# Altium PCB PCB_STM32-v1.1.PcbDoc (part 3 of 3)
Units mil, origin at the board's own origin, x right, y up, seen from the top; angles counter-clockwise.
Board outline 4000 x 2000 mil, 2 copper layers (Top Layer, Bottom Layer), stack 61.811 mil thick; 77 components, 88 nets, 371 pads, 188 vias.
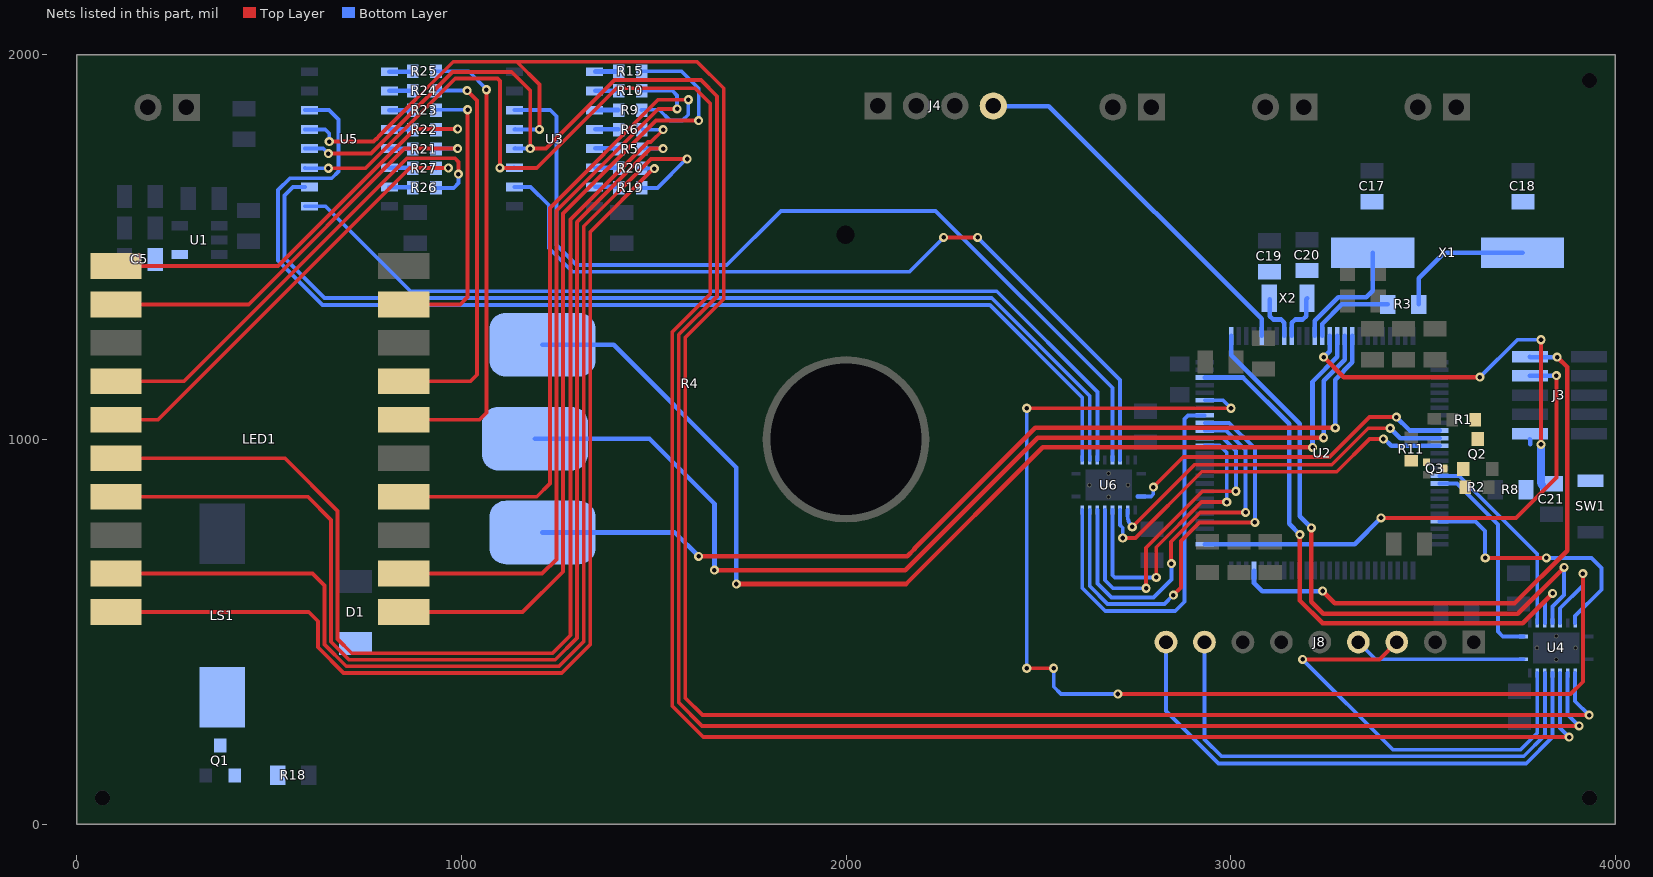
[diagram p2: the nets of this part, all layers, seen from the top]

## Via types
v1: diameter 23.62, hole 11.81, Top Layer to Bottom Layer, 188 vias

## Nets (pads, with @x,y where several pads share a name; then routed paths per layer and width w, separated by ;. In a path a pad name is that pad's centre, name@x,y a point inside that pad or via, vN(x,y) a via of type N, cw(c..) or ccw(c..) an arc to the next point about the centre after c; other vN are vias at no path point) (continued)
HS_B2: U5.1 U6.14 | length 2437.5
  Bottom Layer w10: U5.1@593.35,1606 647,1606 868,1385 2392,1385 2653.47,1123.53 U6.14@2653.47,945.96
HS_BI: U3.4 U4.14 U5.4 | length 5610.3
  Top Layer w10: v1(654,1743) 765.01,1743 977.01,1955 1131,1955 1179,1907 v1(1179,1756) ; v1@1179,1749.14 v1(1179,1756) ; v1(3906,255) 1626,255 1565.19,315.81 1565.19,1272.23 1664.86,1371.9 1664.86,1892.14 1623,1934 1398,1934 1220,1756 v1(1179,1756)
  Bottom Layer w10: U5.4@593.35,1756 641,1756 v1(654,1743) ; U3.4@1139.85,1757.5 U3.4@1138.35,1756 v1(1179,1756) ; U4.14@3876.15,393.01 3876.15,284.85 v1(3906,255)
HS_C1: U3.2 U6.17 | length 2129.2
  Top Layer w10: v1(2254,1525) v1(2342,1525)
  Bottom Layer w10: U3.2@1138.35,1656 1180,1656 1227,1609 1227,1498 1289,1436 2165,1436 v1(2254,1525) ; v1(2342,1525) 2712.53,1154.47 U6.17@2712.53,945.96
HS_C3: U5.2 U6.13 | length 2634.1
  Bottom Layer w10: U5.2@593.35,1656 562,1656 540,1634 540,1472 644,1368 2378.98,1368 2633.79,1113.19 U6.13@2633.79,945.96
HS_D1: U3.6 U6.16 | length 2354.7
  Bottom Layer w10: U3.6@1138.35,1856 1231,1856 1247,1840 1247,1505 1299,1453 1690,1453 1831,1594 2233,1594 2692.84,1134.16 U6.16@2692.84,945.96
HS_D4: U5.6 U6.12 | length 2994.1
  Bottom Layer w10: U5.6@593.35,1856 656,1856 680.18,1831.82 680.18,1696.18 663,1679 554,1679 523,1648 523,1464.96 638.96,1349 2373.93,1349 2614.1,1108.83 U6.12@2614.1,945.96
HS_LE: U3.5 U4.13 U5.5 | length 5615.7
  Top Layer w10: v1(656.37,1774.19) 771.19,1774.19 778,1781 778.97,1781 786,1788.03 786,1789 979,1982 1144,1982 1203,1923 v1(1203,1806) ; 1145,1982 1613,1982 1682,1913 1682,1365 1582.19,1265.19 1582.19,327.91 1627.1,283 v1(3932,283)
  Bottom Layer w10: U5.5@593.35,1806 646,1806 656.37,1795.63 v1(656.37,1774.19) ; U3.5@1139.85,1807.5 U3.5@1138.35,1806 v1(1203,1806) ; U4.13@3895.83,393.01 3895.83,319.17 v1(3932,283)
HS_LT: U3.3 U4.15 U5.3 | length 5671.1
  Top Layer w10: v1(654,1705) 751.05,1705 984.05,1938 1094.14,1938 1100,1932.14 v1(1100,1706) 1196,1706 1403,1913 1607.04,1913 1647,1873.04 1647,1378.08 1548.19,1279.27 1548.19,306.81 1629,226 v1(3880,226)
  Bottom Layer w10: U5.3@593.35,1706 594.35,1705 v1(654,1705) ; v1(1100,1706) U3.3@1138.35,1706 U3.3@1136.85,1707.5 ; U4.15@3856.46,393.01 3856.46,249.54 v1(3880,226)
HS_RESET: J8.9 U4.16 | length 1435.7
  Bottom Layer w10: J8.9@2832,473 2832,294 2968.38,157.62 3768.53,157.62 3836.78,225.86 U4.16@3836.78,393.01
HS_SLEEP: J8.8 U4.17 | length 1341.1
  Bottom Layer w10: J8.8@2932,473 2932,220 2976,176 3762,176 3817.09,231.09 U4.17@3817.09,393.01
LE: U2.47 U4.8 | length 683.1
  Top Layer w10: v1(3662,692.04) v1(3820.96,692.04)
  Bottom Layer w10: U2.47@3543.12,786.83 3637.17,786.83 3661.81,762.19 v1@3661.81,692.04 ; v1(3820.96,692.04) 3937.96,692.04 3964,666 3964,609 3895.83,540.83 U4.8@3895.83,522.93
LS_A1: U2.35 U6.1 | length 896.4
  Top Layer w10: v1(2799,876) 2877,954 3257,954 3361,1058 v1(3431,1058)
  Bottom Layer w10: U6.1@2757.65,851.47 2793.14,851.47 2799,857.33 v1(2799,876)
  Bottom Layer w12: v1(3431,1058) 3465.94,1023.06 U2.35@3543.12,1023.06
LS_A2: U2.90 U6.6 | length 896.9
  Top Layer w10: v1(2780.12,612.89) 2780.12,718.12 2927.19,865.19 v1(3013.76,865.19)
  Bottom Layer w10: U6.6@2673.16,816.04 2673.16,633.84 2694.11,612.89 v1(2780.12,612.89) ; U2.90@2932.88,1003.37 2979.95,1003.37 3013.76,969.57 v1(3013.76,865.19)
LS_B1: U2.36 U6.3 | length 962.6
  Top Layer w10: v1(2744.16,772.43) 2905.73,934 3263,934 3358,1029 v1(3415,1029)
  Bottom Layer w10: U6.3@2732.21,816.04 2732.21,801.28 ccw(c2773.01,801.28) v1(2744.16,772.43)
  Bottom Layer w12: v1(3415,1029) 3440.63,1003.37 U2.36@3543.12,1003.37
LS_B2: U2.91 U6.7 | length 1030.8
  Top Layer w10: v1(2846,677) 2845,678 2845,734 2921,810 v1(3039,810)
  Bottom Layer w10: U6.7@2653.47,816.04 2653.47,625.53 2689.92,589.08 2799.08,589.08 2846,636 v1(2846,677) ; U2.91@2932.88,1023.06 2988.11,1023.06 3038.81,972.35 v1@3038.81,810
LS_C1: U2.37 U6.4 | length 1012.6
  Top Layer w10: v1(2719.65,743.62) 2752.62,743.62 2925,916 3276,916 3361,1001 v1(3397,1001)
  Bottom Layer w10: U6.4@2712.53,816.04 2712.53,777.47 2719.65,770.35 v1(2719.65,743.62)
  Bottom Layer w12: v1(3397,1001) 3400.14,1001 3417.46,983.69 U2.37@3543.12,983.69
LS_C3: U2.92 U6.8 | length 1154.6
  Top Layer w10: v1(2851,595) 2871,615 2871,735.96 2919.04,784 v1(3063,784)
  Bottom Layer w10: U6.8@2633.79,816.04 2633.79,627.9 2633.67,627.78 2633.67,618.38 2679.97,572.08 2828.08,572.08 v1(2851,595) ; U2.92@2932.88,1042.74 2996.26,1042.74 3063,976 v1(3063,784)
LS_D1: U2.89 U6.5 | length 789.1
  Top Layer w10: v1(2806.59,641) 2806.59,719.63 2923.96,837 v1(2989.94,837)
  Bottom Layer w10: U6.5@2692.84,816.04 2692.84,646.86 2698.7,641 v1(2806.59,641) ; U2.89@2932.88,983.68 2971.8,983.68 2989.94,965.54 v1(2989.94,837)
LS_D4: U2.93 U6.9 | length 1033.3
  Bottom Layer w10: 2614.1,613.89 U6.9@2614.1,816.04 ; 2615,613 2674,554 2856,554 2880,578 2880,1053 2889.43,1062.43 U2.93@2932.88,1062.43
LT: U2.95 U4.6 | length 3232.6
  Top Layer w10: v1(2470,405) v1(2540,405) ; v1(2470,1081) v1(3001,1081) ; v1(2707,338) 3884,338 3916,370 v1(3916,651)
  Bottom Layer w10: v1(2470,405) v1(2470,1081) ; v1(2540,405) 2540,357 2559,338 v1(2707,338) ; U2.95@2932.88,1101.8 2980.2,1101.8 v1(3001,1081) ; U4.6@3856.46,522.93 3856.46,560.78 3916,620.31 v1(3916,651)
MCU_RX: U2.42 U4.1 | length 546.9
  Bottom Layer w10: U2.42@3543.12,885.26 3588.41,885.26 3694.81,778.86 3694.81,500.19 3707.5,487.5 U4.1@3761.98,487.5
MCU_SWCLK: J3.4 U2.76 | length 1320.1
  Top Layer w10: v1(3391,796) 3742,796 3847,901 v1(3847,1166)
  Bottom Layer w12: U2.76@2932.88,727.78 3322.78,727.78 v1(3391,796) ; J3.4@3778.23,1165 3778.73,1165.5 3846.5,1165.5 v1(3847,1166)
MCU_SWDIO: J3.2 U2.72 | length 1509.6
  Top Layer w12: v1@3239.81,605 3270.81,574 3738,574 3874.81,710.81 3874.81,1188.19 v1(3849,1214)
  Bottom Layer w12: U2.72@3060.83,658.88 3060.93,658.79 3060.93,626.07 3082,605 3238.19,605 v1(3239,605.81) ; J3.2@3778.23,1215 3779.23,1214 v1(3849,1214)
MCU_TX: U2.41 U4.3 | length 517.3
  Bottom Layer w10: U2.41@3543.12,904.94 3594.33,904.94 3797.15,702.13 3797.15,615.29 3797.41,615.02 U4.3@3797.41,522.93
NetC5_2: C5.2 U1.4
NetC18_2: C18.2 R3.1 X1.1 | length 365.3
  Bottom Layer w12: R3.1@3489,1351 3489,1419 3555,1485 X1.1@3759,1485
NetD1_2: D1.2 LS1.2 Q1.3
NetQ1_1: Q1.1 R18.2
NetQ2_1: Q2.1 Q3.3 R2.2
NetQ3_1: Q3.1 R11.2
NetR4_1: R4.1 U2.15 | length 2901
  Top Layer w12: v1(1715,624) 2156,624 2511.38,979.38 v1(3213,979.38)
  Bottom Layer w12: R4.1@1210.86,1246.17 1395.83,1246.17 1715,927 v1(1715,624) ; v1(3213,979.38) 3213,1150.1 3277.37,1214.47 U2.15@3277.37,1269.12
NetR4_2: R4.2 U2.16 | length 2723.3
  Top Layer w12: v1(1658,660) 2154,660 2498.19,1004.19 v1(3242,1004.19)
  Bottom Layer w12: R4.2@1191.26,1002.07 1489,1002.07 1658,833.07 v1(1658,660) ; v1@3242,1005 3242,1152.23 3297.06,1207.29 U2.16@3297.06,1269.12
NetR4_3: R4.3 U2.17 | length 2485.5
  Top Layer w12: v1(1617,696) 2159,696 2178,715 ; 2177.5,715.5 2492,1030 v1@3271,1030
  Bottom Layer w12: R4.3@1210.86,757.98 1555.02,757.98 v1(1617,696) 1618,695 v1@1620,695 ; v1(3272,1030) 3272,1155.36 3316.74,1200.1 U2.17@3316.74,1269.12
NetR5_1: R5.1 U3.13 | length 60
  Bottom Layer w12: U3.13@1348.15,1756.5 R5.1@1408.18,1756.5
NetR6_1: R6.1 U3.12 | length 60
  Bottom Layer w12: U3.12@1348.15,1806.5 R6.1@1408.18,1806.5
NetR9_1: R9.1 U3.11 | length 60
  Bottom Layer w12: U3.11@1348.15,1856.5 R9.1@1408.18,1856.5
NetR10_1: R10.1 U3.10 | length 60
  Bottom Layer w12: U3.10@1348.15,1906.5 R10.1@1408.18,1906.5
NetR15_1: R15.1 U3.9 | length 61.4
  Bottom Layer w12: U3.9@1347.65,1956 1348.15,1956.5 1408.18,1956.5 R15.1@1408.68,1957
NetR19_1: R19.1 U3.15 | length 60
  Bottom Layer w12: U3.15@1348.15,1656.5 R19.1@1408.18,1656.5
NetR20_1: R20.1 U3.14 | length 60
  Bottom Layer w12: U3.14@1348.15,1706.5 R20.1@1408.18,1706.5
NetR21_1: R21.1 U5.13 | length 60
  Bottom Layer w12: U5.13@812.65,1756 R21.1@872.68,1756
NetR22_1: R22.1 U5.12 | length 60
  Bottom Layer w12: U5.12@812.65,1806 R22.1@872.68,1806
NetR23_1: R23.1 U5.11 | length 60
  Bottom Layer w12: U5.11@812.65,1856 R23.1@872.68,1856
NetR24_1: R24.1 U5.10 | length 60
  Bottom Layer w12: U5.10@812.65,1906 R24.1@872.68,1906
NetR25_1: R25.1 U5.9 | length 60
  Bottom Layer w12: U5.9@812.65,1956 R25.1@872.68,1956
NetR26_1: R26.1 U5.15 | length 60
  Bottom Layer w12: U5.15@812.65,1656 R26.1@872.68,1656
NetR27_1: R27.1 U5.14 | length 60
  Bottom Layer w12: U5.14@812.65,1706 R27.1@872.68,1706
NRST: C21.2 J3.10 R8.2 SW1.1 U2.14 | length 1084.3
  Top Layer w10: v1(3807,987) v1(3807,1259)
  Top Layer w12: v1(3241.91,1214.09) 3294.19,1161.81 v1(3648,1161.81)
  Bottom Layer w10: v1(3648,1161.81) 3648.81,1161.81 3746,1259 v1(3807,1259)
  Bottom Layer w12: v1(3241.91,1214.09) 3242.09,1214.09 3257.59,1229.59 3257.59,1269.02 U2.14@3257.69,1269.12 ; 3778.23,1000 3779,999.23 3779,987
  Bottom Layer w20: v1(3807,987) 3807,933 3807,890.07 ccw(c3824.07,890.07) C21.2@3812,878
OSC_IN: C19.2 U2.8 X2.2 | length 122.7
  Bottom Layer w12: X2.2@3102.24,1364.6 3102.24,1320.6 3111.17,1311.67 3131.17,1311.67 3139.57,1303.26 U2.8@3139.57,1269.12
OSC_OUT: C20.2 U2.9 X2.1@3199,1367 | length 126.1
  Bottom Layer w12: U2.9@3159.26,1269.12 3159.26,1303.26 3167.67,1311.67 3187.67,1311.67 3196.6,1320.6 3196.6,1364.6 X2.1@3199,1367
RED_BUTTON: J4.4 U2.5 | length 971
  Bottom Layer w12: J4.4@2383,1866.5 2527.5,1866.5 3080.52,1313.48 U2.5@3080.52,1269.12
RESET: U2.1 U4.5 | length 1653.6
  Top Layer w12: v1(3210,770) 3210,577.91 3240.91,547 3747,547 v1(3867,667)
  Bottom Layer w10: U4.5@3836.78,522.93 3836.78,565.54 3867,595.76 v1(3867,667)
  Bottom Layer w12: U2.1@3001.78,1269.12 3001.78,1218.86 3180,1040.64 3180,800 v1(3210,770)
"SEG A1": LED1.17 R5.2 | length 3022.8
  Top Layer w10: LED1.17@101.98,851 601,851 661.25,790.75 661.25,473.71 707.96,427 1244.04,427 1300.75,483.71 1300.75,1564.75 1492,1756 v1(1524.68,1756)
  Bottom Layer w10: R5.2@1469.68,1756 v1(1524.68,1756)
"SEG A2": LED1.12 R21.2 | length 1127
  Top Layer w10: LED1.12@87.18,1351 LED1.12@101.98,1351 447.04,1351 852.04,1756 v1(990,1756)
  Bottom Layer w10: R21.2@934,1755 935,1756 v1(990,1756)
"SEG B1": LED1.16 R6.2 | length 3080.1
  Top Layer w10: LED1.16@101.98,951 541.04,951 678.25,813.79 678.25,480.75 715,444 1237,444 1283.75,490.75 1283.75,1571.79 1484.96,1773 1492.49,1773 v1(1524.68,1805.19)
  Bottom Layer w10: R6.2@1470.18,1807 1471.99,1805.19 v1(1524.68,1805.19)
"SEG B2": LED1.11 R22.2 | length 1107.9
  Top Layer w10: LED1.11@86.23,1451 LED1.11@101.98,1451 523,1451 879,1807 v1(990,1807)
  Bottom Layer w10: R22.2@934,1805.5 935.5,1807 v1(990,1807)
"SEG C1": LED1.4 R9.2 | length 1765.7
  Top Layer w10: LED1.4@850.02,851 1196,851 1230,885 1230,1601.47 1511.53,1883 v1(1590,1883)
  Bottom Layer w10: R9.2@1468.68,1856 1469.68,1857 1514.37,1857 1542.37,1829 1575,1829 1590,1844 v1(1590,1883)
"SEG C2": LED1.9 R23.2 | length 743.5
  Top Layer w10: LED1.9@850.02,1351 997,1351 1016.19,1370.19 v1(1016.19,1857)
  Bottom Layer w10: R23.2@934,1856 935,1857 v1(1016.19,1857)
"SEG D1": LED1.2 R10.2 | length 1874.7
  Top Layer w10: LED1.2@850.02,651 1210,651 1247,688 1247,1594.43 1511.76,1859.19 v1(1561,1859.19)
  Bottom Layer w10: R10.2@1468.68,1906.5 1548.5,1906.5 1561,1894 v1(1561,1859.19)
"SEG D2": LED1.7 R24.2 | length 1028.3
  Top Layer w10: LED1.7@850.02,1151 1024,1151 1041,1168 1041,1881 v1(1015,1907)
  Bottom Layer w10: R24.2@934.5,1907 v1(1015,1907)
"SEG E1": LED1.1 R15.2 | length 2092.3
  Top Layer w10: LED1.1@850.02,551 1159,551 1264,656 1264,1587.39 1505.61,1829 v1(1617,1829)
  Bottom Layer w10: R15.2@1468.68,1957 1572.67,1957 1617,1912.67 v1(1617,1829)
"SEG E2": LED1.6 R25.2 | length 1213.6
  Top Layer w10: LED1.6@850.02,1051 1047,1051 1065.19,1069.19 v1@1065.19,1907.19
  Bottom Layer w10: R25.2@934,1957 1019,1957 v1@1067,1909
  other v1: 1065,1909
"SEG F1": LED1.19 R19.2 | length 3003.2
  Top Layer w10: LED1.19@101.98,651 613,651 644,620 644,466.56 700.56,410 1253.96,410 1318,474.04 1318,1554 1493,1729 v1(1587.04,1729)
  Bottom Layer w10: R19.2@1468.68,1654 1509.68,1654 1584.68,1729 v1(1587.04,1729)
"SEG F2": LED1.14 R26.2 | length 1253.3
  Top Layer w10: LED1.14@101.98,1151 279,1151 859,1731 983,1731 992.38,1721.62 v1(992.38,1689.8)
  Bottom Layer w10: R26.2@934,1654 980,1654 992.38,1666.38 v1(992.38,1689.8)
"SEG G1": LED1.20 R20.2 | length 2708.6
  Top Layer w10: LED1.20@101.98,551 603,551 627,527 627,459.52 693.52,393 1261,393 1335,467 1335,1539.63 1499.41,1704.04 v1(1501.71,1704.04)
  Bottom Layer w10: R20.2@1469.8,1705.62 1471.38,1704.04 v1(1501.71,1704.04)
"SEG G2": LED1.15 R27.2 | length 1168
  Top Layer w10: LED1.15@101.98,1051 211,1051 865.62,1705.62 v1(966.16,1705.62)
  Bottom Layer w10: R27.2@934,1704.5 935.12,1705.62 v1(966.16,1705.62)
SLEEP: U2.98 U4.4 | length 1539.4
  Top Layer w12: v1(3180,752.59) 3180,581.04 3239.04,522 3759.57,522 v1(3837.28,599.72)
  Bottom Layer w10: U4.4@3817.09,522.93 3817.09,579.53 v1(3837.28,599.72)
  Bottom Layer w12: U2.98@2932.88,1160.85 2932.98,1160.76 3032.24,1160.76 3152,1041 3152,780.59 v1(3180,752.59)
UC_RXD: J8.3 U4.18 | length 1146
  Top Layer w10: v1(3187,428) 3387,428 J8.3@3432,473
  Bottom Layer w10: v1(3187,428) 3422,193 3754,193 3797.41,236.41 U4.18@3797.41,393.01
UC_TXD: J8.4 U4.20 | length 448.4
  Bottom Layer w10: J8.4@3332,473 3376.56,428.44 U4.20@3761.98,428.44
V_MON: Q2.3 R1.2
XIN: C17.2 U2.12 X1.2 | length 321.1
  Bottom Layer w12: U2.12@3218.31,1269.12 3218.31,1308.18 3280.13,1370 3353,1370 3369.24,1386.24 X1.2@3369.24,1485
XOUT: R3.2 U2.13 | length 223
  Bottom Layer w12: U2.13@3238,1269.12 3238.09,1269.21 3238.09,1300.09 3289,1351 R3.2@3409,1351
pads on no net: FD1.1 FD2.1 FD3.1 J3.6 J3.7 J3.8 J8.6 J8.7 LED1.5 LED1.10 R4.MH U2.2 U2.3 U2.4 U2.10 U2.11 U2.18 U2.24 U2.25 U2.26 U2.29 U2.30 U2.33 U2.34 U2.43 U2.44 U2.45 U2.46 U2.48 U2.51 U2.52 U2.53 U2.54 U2.55 U2.56 U2.57 U2.58 U2.59 U2.60 U2.61 U2.62 U2.63 U2.64 U2.65 U2.66 U2.67 U2.68 U2.69 U2.70 U2.71 U2.77 U2.78 U2.79 U2.80 U2.81 U2.82 U2.83 U2.84 U2.85 U2.86 U2.87 U2.88 U4.9 U4.12 X2.1@3199,1367

## Polygon pours and split planes (outlines as drawn)
GND on Top Layer "GND_L01_P000" (solid, remove dead copper, pour order 0): 0,0 0,2000 4000,2000 4000,0
GND on Bottom Layer "GND_L02_P001" (solid, remove dead copper, pour order 1): 0,0 0,2000 4000,2000 4000,0

## Other copper
Top Layer:
  rectangle net GND: 3498,1267 3602,1319
  rectangle net 5V: 406,1793 774,1853
  rectangle net 3V3: 267,1025 490.72,1065
  rectangle net 3V3: 2985,574 3053,634
  rectangle net 5V: 3329,589 3368,839
  rectangle net 5V: 3329,588 3567,679
  rectangle net 3V3: 3574.59,596 3611,706
  rectangle net 5V: 3329,818 3709,839
  rectangle net 5V: 3647,818 3709,945
  rectangle net V_MON: 3621,978 3661,1070
  rectangle net BAT_ADC: 3489,1033 3593,1070
  rectangle net NetQ3_1: 3447,929 3519,961
  rectangle net NetQ2_1: 3541.64,853 3626,945
  region net 3V3: 2580,546 1606,546 1606,500 2580,500
  rectangle net 3V3: 3751,937 3786,1309
  rectangle net 3V3: 3575,594 3737,631
  rectangle net 3V3: 3514,743 3813,774
  rectangle net 3V3: 440,1029 492,1177
  rectangle net 3V3: 3619,1192 3664,1373
  rectangle net 3V3: 3483,1332.19 3664,1373
  rectangle net 3V3: 3108,1267 3347,1318
  rectangle net 3V3: 2893,1256 3115,1318
  rectangle net 3V3: 2893,1154 2956,1284
  rectangle net 5V: 406,1560 517,1833
  rectangle net 5V: 401,1560 470,1915
  rectangle net 5V: 2608,361 3760,406
  rectangle net 5V: 3499,363 3568,505
  rectangle net 3V3: 3479,695 3611,774
  rectangle net GND: 2973,1154 3036,1247
  rectangle net GND: 2992,1154 3115,1205
  rectangle net 3V3: 3053,1214 3115,1284
  rectangle net 3V3: 2909,628 3136,674
  rectangle net GND: 2909,690 3136,755
  rectangle net 3V3: 3498,1187 3664,1239
  rectangle net GND: 3337,1187 3481,1257
  rectangle net 3V3: 3337,1267 3489,1373
  rectangle net 3V3: 3337,1268 3405,1475
  region net 5V: 2639,406 2585,406 2542,363 2361,363 2361,300 2639,300
Bottom Layer:
  rectangle net 5V: 1281,1563 1315,1731
  rectangle net 5V: 1289,1563 1454,1619
  rectangle net GND: 2756,660 2817,706
  rectangle net 3V3: 3707,509 3784,622
  rectangle net 3V3: 2984,564 3055,608
  rectangle net 3V3: 856,500 1650,546
  rectangle net 3V3: 856,531 981.51,1130
  rectangle net 3V3: 439,1051 981.51,1188
  rectangle net 3V3: 3879,1199 3993,1306
  rectangle net GND: 3897,737 3980,814
  rectangle net 3V3: 21,1024 81,1745
  rectangle net 3V3: 21,1024 304,1111
  rectangle net 3V3: 21,1686 263,1745
  rectangle net 3V3: 2547,510 2584,861
  rectangle net 3V3: 2552,839 2601,861
  rectangle net 3V3: 2768,739 2819,828
  rectangle net 3V3: 2749,803 2819,828
  rectangle net 5V: 727,1608 783,1853
  rectangle net 5V: 787,1564 954,1620
  rectangle net 5V: 3692,311 3783,406
  rectangle net 3V3: 3518,694 3567,734
  rectangle net GND: 3799,785 3980,827
  rectangle net NRST: 3745,841 3980,910
  rectangle net 5V: 3716,321 3783,367
  rectangle net 5V: 2749,930 2801,1014
  rectangle net GND: 406,1464 509,1535
  rectangle net 5V: 244,1823 470,1915
  rectangle net XIN: 3336.24,1453 3403.24,1638
  rectangle net NetC18_2: 3726,1453 3793,1638
  rectangle net OSC_IN: 3065.57,1372 3135.57,1461
  rectangle net OSC_OUT: 3164,1372 3234,1461
  rectangle net NetD1_2: 311,244 775,498
  rectangle net 5V: 319,586 775,840
  region net NetD1_2: 311,412 311,183.97 434,183.97 434,412
  rectangle net GND: 102,1437 153,1662
  rectangle net 3V3: 182,1515.8 263,1745
  rectangle net 3V3: 182,1515.8 291,1580.8
  rectangle net NetC5_2: 182,1437 291,1502
  rectangle net 5V: 319,1468 341,1748
  rectangle net 5V: 319,826 393,1493
  rectangle net GND: 349,1505 505,1530
  rectangle net 5V: 337,1543 509,1748
  rectangle net NRST: 3730,971 3825,1029
  rectangle net GND: 3879,1097 3993,1183
  rectangle net GND: 3599,442 3673,584
  rectangle net 5V: 3499,442 3568,584
  region net NetQ1_1: 542,153 390,153 390,88 542,88
  region net 5V: 1050.49,1620 1112.31,1555 1112.31,1519 1047,1519 1002,1564 946,1564 946,1620
  region net 5V: 3568,634 3536,634 3499,597 3499,575 3568,575
  region net 5V: 741,1564 727,1578 727,1620 829,1620 829,1564
  region net OSC_IN: 3135.57,1379 3135.57,1348 3119.57,1332 3080.57,1332 3065.57,1347 3065.57,1379
  region net OSC_OUT: 3234,1379 3234,1348 3218,1332 3179,1332 3164,1347 3164,1379

## Silkscreen, mask and mechanical layers (free items; w line width, h text height)
Bottom Overlay:
  drawing of 16 lines, arcs and shapes, not listed
  text "-VE" at 80,1798 h50 r270
  text "+VE" at 335,1798 h50 r270
  text "PANEL" at 2347,1689 h50
  text "BUTTON-3" at 2858,1686 h50
  text "BUTTON-2" at 3254.5,1686 h50
  text "BUTTON-1" at 3651,1686 h50
  text "BATTERY" at 343,1685 h50
  text "RESET" at 3998,673 h65
  text "BUZZER" at 57,262 h65 r270
  text "PCB-v1.1" at 2162,24.07 h100
  text "433MHz RADIO MODULE" at 3701,8 h65
Dimension:
  lines w12: 0,1000 4000,1000 ; 2000,0 2000,2000
Board Outline:
  the board outline again, w12
Fabrication:
  drawing of 191 lines, arcs and shapes, not listed
  text "Layer" at 4613.58,850 h60
  text "Name" at 5023.49,850 h60
  text "Material" at 5953.23,850 h60
  text "Thickness" at 6813,850 h60
  text "Constant" at 7462.84,850 h60
  text "Board Layer Stack" at 8032.7,850 h60
  text "Top Overlay" at 5023.49,730 h60
  text "Top Solder" at 5023.49,610 h60
  text "Solder Resist" at 5953.23,610 h60
  text "0.39mil" at 6813,610 h60
  text "3.5" at 7462.84,610 h60
  text "1" at 4613.58,490 h60
  text "Top Layer" at 5023.49,490 h60
  text "1.38mil" at 6813,490 h60
  text "Dielectric 1" at 5023.49,370 h60
  text "Dielectric" at 5953.23,370 h60
  text "59.06mil" at 6813,370 h60
  text "4.8" at 7462.84,370 h60
  text "2" at 4613.58,250 h60
  text "Bottom Layer" at 5023.49,250 h60
  text "1.38mil" at 6813,250 h60
  text "Bottom Solder" at 5023.49,130 h60
  text "Solder Resist" at 5953.23,130 h60
  text "0.39mil" at 6813,130 h60
  text "3.5" at 7462.84,130 h60
  text "Bottom Overlay" at 5023.49,10 h60
  text "Total board thickness:" at 4613.58,-110 h60
  text "62.60mil" at 6813,-110 h60
Drill Drawing:
  circle w10: c4627.62,2009.28 r33.33
  lines w10: 4594.29,1375.94 4627.62,1392.61 4660.96,1375.94 4644.29,1409.28 4660.96,1442.61 4627.62,1425.94 4594.29,1442.61 4610.96,1409.28 4594.29,1375.94 ; 4594.29,1525.94 4660.96,1525.94 4660.96,1592.61 4594.29,1592.61 4594.29,1525.94 ; 4594.29,1742.61 4660.96,1742.61 4627.62,1675.94 4594.29,1742.61 ; 4594.29,1825.94 4594.29,1842.61 4610.96,1859.28 4594.29,1875.94 4594.29,1892.61 4610.96,1892.61 4627.62,1875.94 4644.29,1892.61 4660.96,1892.61 4660.96,1875.94 4644.29,1859.28 4660.96,1842.61 4660.96,1825.94 4644.29,1825.94 4627.62,1842.61 4610.96,1825.94 4594.29,1825.94 ; 4594.29,2142.61 4610.96,2142.61 4627.62,2125.94 4644.29,2142.61 4660.96,2142.61 4644.29,2159.28 4660.96,2175.94 4644.29,2175.94 4627.62,2192.61 4610.96,2175.94 4594.29,2175.94 4610.96,2159.28 4594.29,2142.61 ; 4594.29,2292.61 4610.96,2292.61 4610.96,2275.94 4644.29,2275.94 4644.29,2292.61 4660.96,2292.61 4660.96,2325.94 4644.29,2325.94 4644.29,2342.61 4610.96,2342.61 4610.96,2325.94 4594.29,2325.94 4594.29,2292.61
  lines w15: 4534.5,1330.94 17992.71,1330.94 ; 4534.5,2380.94 17992.71,2380.94 ; 5085.38,1180.94 5085.38,2530.94 ; 5685.22,1180.94 5685.22,2530.94 ; 6894.86,1180.94 6894.86,2530.94 ; 7400.74,1180.94 7400.74,2530.94 ; 8134.54,1180.94 8134.54,2530.94 ; 9634.09,1180.94 9634.09,2530.94 ; 10223.94,1180.94 10223.94,2530.94 ; 10969.74,1180.94 10969.74,2530.94 ; 11919.46,1180.94 11919.46,2530.94 ; 12773.23,1180.94 12773.23,2530.94 ; 14106.84,1180.94 14106.84,2530.94 ; 15440.44,1180.94 15440.44,2530.94 ; 16590.11,1180.94 16590.11,2530.94 ; 4534.5,1180.94 17992.71,1180.94 17992.71,2530.94 4534.5,2530.94 4534.5,1180.94
  text "Symbol" at 4624.5,2425.94 h72
  text "Count" at 5130.38,2425.94 h72
  text "Hole Size" at 5730.22,2425.94 h72
  text "Plated" at 6939.86,2425.94 h72
  text "Hole Type" at 7445.74,2425.94 h72
  text "Drill Layer Pair" at 8179.54,2425.94 h72
  text "Via/Pad" at 9679.09,2425.94 h72
  text "Pad Shape" at 10268.94,2425.94 h72
  text "Template" at 11014.74,2425.94 h72
  text "Description" at 11964.46,2425.94 h72
  text "Hole Tolerance (+)" at 12818.23,2425.94 h72
  text "Hole Tolerance (-)" at 14151.84,2425.94 h72
  text "Hole Length" at 15485.44,2425.94 h72
  text "Routed Path Length" at 16635.11,2425.94 h72
  text "1" at 5130.38,2275.94 h60
  text "47.24mil (1.200mm)" at 5730.22,2275.94 h60
  text "NPTH" at 6939.86,2275.94 h60
  text "Rectangle" at 7445.74,2275.94 h60
  text "Top Layer - Bottom Layer" at 8179.54,2275.94 h60
  text "Pad" at 9679.09,2275.94 h60
  text "Rounded" at 10268.94,2275.94 h60
  text "c0hn120_325" at 11014.74,2275.94 h60
  text "127.95mil (3.250mm)" at 15485.44,2275.94 h60
  text "127.95mil (3.250mm)" at 16635.11,2275.94 h60
  text "1" at 5130.38,2125.94 h60
  text "393.70mil (10.000mm)" at 5730.22,2125.94 h60
  text "NPTH" at 6939.86,2125.94 h60
  text "Round" at 7445.74,2125.94 h60
  text "Top Layer - Bottom Layer" at 8179.54,2125.94 h60
  text "Pad" at 9679.09,2125.94 h60
  text "Rounded" at 10268.94,2125.94 h60
  text "c1100hn1000" at 11014.74,2125.94 h60
  text "-" at 15485.44,2125.94 h60
  text "-" at 16635.11,2125.94 h60
  text "3" at 5130.38,1975.94 h60
  text "39.37mil (1.000mm)" at 5730.22,1975.94 h60
  text "PTH" at 6939.86,1975.94 h60
  text "Round" at 7445.74,1975.94 h60
  text "Top Layer - Bottom Layer" at 8179.54,1975.94 h60
  text "Pad" at 9679.09,1975.94 h60
  text "Rounded" at 10268.94,1975.94 h60
  text "c100h100m200p-1" at 11014.74,1975.94 h60
  text "-" at 15485.44,1975.94 h60
  text "-" at 16635.11,1975.94 h60
  text "8" at 5130.38,1825.94 h60
  text "7.87mil (0.200mm)" at 5730.22,1825.94 h60
  text "PTH" at 6939.86,1825.94 h60
  text "Round" at 7445.74,1825.94 h60
  text "Top Layer - Bottom Layer" at 8179.54,1825.94 h60
  text "Pad" at 9679.09,1825.94 h60
  text "Rounded" at 10268.94,1825.94 h60
  text "c30h20m0mx0" at 11014.74,1825.94 h60
  text "-" at 15485.44,1825.94 h60
  text "-" at 16635.11,1825.94 h60
  text "9" at 5130.38,1675.94 h60
  text "35.43mil (0.900mm)" at 5730.22,1675.94 h60
  text "PTH" at 6939.86,1675.94 h60
  text "Round" at 7445.74,1675.94 h60
  text "Top Layer - Bottom Layer" at 8179.54,1675.94 h60
  text "Pad" at 9679.09,1675.94 h60
  text "(Mixed)" at 10268.94,1675.94 h60
  text "(Mixed)" at 11014.74,1675.94 h60
  text "-" at 15485.44,1675.94 h60
  text "-" at 16635.11,1675.94 h60
  text "12" at 5130.38,1525.94 h60
  text "40.16mil (1.020mm)" at 5730.22,1525.94 h60
  text "PTH" at 6939.86,1525.94 h60
  text "Round" at 7445.74,1525.94 h60
  text "Top Layer - Bottom Layer" at 8179.54,1525.94 h60
  text "Pad" at 9679.09,1525.94 h60
  text "(Mixed)" at 10268.94,1525.94 h60
  text "(Mixed)" at 11014.74,1525.94 h60
  text "-" at 15485.44,1525.94 h60
  text "-" at 16635.11,1525.94 h60
  text "188" at 5130.38,1375.94 h60
  text "11.81mil (0.300mm)" at 5730.22,1375.94 h60
  text "PTH" at 6939.86,1375.94 h60
  text "Round" at 7445.74,1375.94 h60
  text "Top Layer - Bottom Layer" at 8179.54,1375.94 h60
  text "Via" at 9679.09,1375.94 h60
  text "Rounded" at 10268.94,1375.94 h60
  text "v60h30" at 11014.74,1375.94 h60
  text "-" at 15485.44,1375.94 h60
  text "-" at 16635.11,1375.94 h60
  text "222 Total" at 5130.38,1225.94 h60
  text "Slot definitions :" at 4624.5,1080.97 h60
  text "Routed Path Length" at 5657.19,1080.97 h60
  text "= Calculated from tool start centre position to tool end centre position." at 6759.86,1080.97 h60
  text "Hole Length" at 5657.19,980.99 h60
  text "= Routed Path Length + Tool Size = Slot length as defined in the PCB layout" at 6349.99,980.99 h60

## Dimensions
2000,803.15 to 2000,1196.85 on Dimension
4000,2000 to 4000,0 on Dimension
0,2010 to 4000,2000 on Dimension

## Text inside footprints (layer, text, board x,y; h text height)
LED1: Top Overlay "1" at 768,569 h39.37 r180